# Altium PCB DT10966_MOTOR_CONTROLLER.PcbDoc (part 3 of 8)
Units mm, origin at the board's own origin, x right, y up, seen from the top; angles counter-clockwise.
Board outline 300 x 19 mm, 10 copper layers (Top Layer, Layer 2 GND, Layer 3 SIG, Layer 4 GND, Layer 5 PWR, Layer 6 PWR, Layer 7 GND, Layer 8 SIG, Layer 9 GND, Bottom Layer), stack 2.418 mm thick; 745 components, 446 nets, 2132 pads, 1222 vias.
Unrouted connection lines stored in the file: 3.
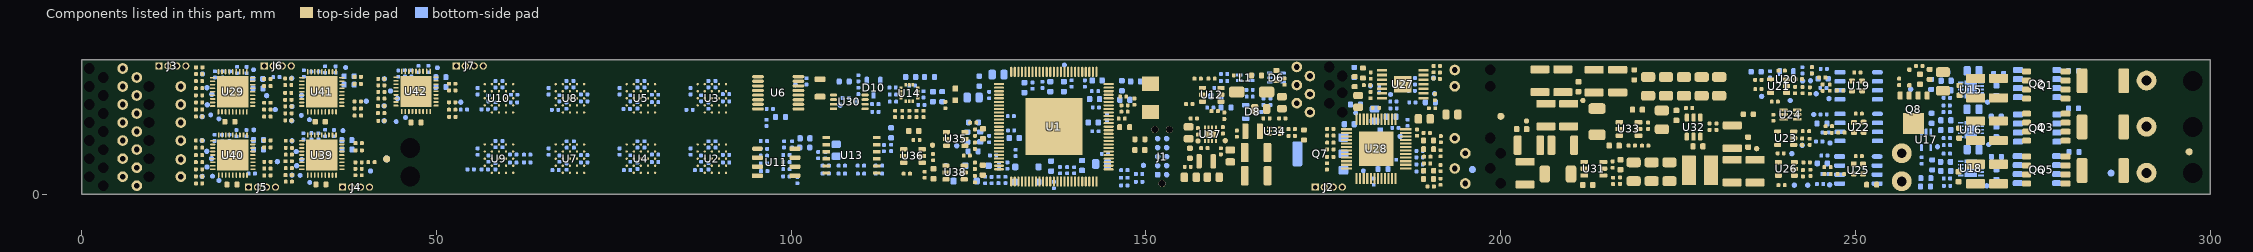
[diagram p10: the components of this part, seen from the top]

## Part data (continued)
L1: library part AWCU00201212900M02, "CMC 330MA 2LN 90OHM SMD AEC-Q200", Manufacturer="Pulse Electronics", MPN=AWCU00201212900M02
L2: library part CMP-00887-1, "FIXED IND 22UH 1.2A 500 MOHM SMD", Inductance=22µH, Manufacturer="Bourns Inc.", Op Temp max=150°C, Op Temp min=-40°C, Package=2-SMD, Ratings=AEC-Q200, Tolerance=20%, ComponentLink1Description=Datasheet, ComponentLink1URL=https://www.bourns.com/docs/Product-Datasheets/SRP4020TA.pdf, ComponentLink2Description=Mouser, ComponentLink2URL=https://eu.mouser.com/ProductDetail/Bourns/SRP4020TA-220M?qs=6oMev5NRZMH3jbGE7KrwKQ%3D%3D, ComponentLink3Description=Digikey, ComponentLink3URL=https://www.digikey.com/en/products/detail/bourns-inc/SRP4020TA-220M/6153694?s=N4IgTCBcDaIAQGUBKAFALABjBgKgQQFoxsBZEAXQF8g, DCR=0.5, Fsr=19MHz, Height max=2mm, I=1.2A, Isat=1.4A, Lead Spacing=0mm, Material - Core="Carbonyl Powder", Mounting Type=SM, MPN=SRP4020TA-220M, Shielding=Shielded, Size="4.45mm x 4.06mm", Type="Drum Core, Wirewound"
L3: library part IND_SRR4828A-180M, "FIXED IND 18UH 1.7A 160 MOHM SMD", Current - Saturation (Isat)=0.8A, Current Rating (Amps)=1.7A, DC Resistance (DCR)=160mOhm, Frequency - Self Resonant=22MHz, Inductance="18 µH", Inductance Frequency - Test="100 kHz", Manufacturer="Bourns Inc.", Q @ Freq=-, Ratings=AEC-Q200, Tolerance=±20%, ComponentLink1Description=DigiKey, ComponentLink1URL=https://www.digikey.com/en/products/detail/bourns-inc/SRR4828A-180M/7556024, ComponentLink2Description=Datasheet, ComponentLink2URL=https://www.bourns.com/docs/Product-Datasheets/SRR4828A.pdf, ComponentLink3Description=Mouser, ComponentLink3URL=https://eu.mouser.com/ProductDetail/Bourns/SRR4828A-180M?qs=EU6FO9ffTwc4nWVXADcZcw%3D%3D, Material - Core=Ferrite, Mounting Type=SM, MPN=SRR4828A-180M, Shielding=Shielded, Type="Drum Core, Wirewound"
L4: library part CMP-00885-1, "FIXED IND 8.2UH 2A 180 MOHM SMD", Inductance=8.2µH, Manufacturer="Bourns Inc.", Op Temp max=150°C, Op Temp min=-40°C, Package=2-SMD, Ratings=AEC-Q200, Tolerance=20%, ComponentLink1Description=Datasheet, ComponentLink1URL=https://www.bourns.com/docs/Product-Datasheets/SRP4020TA.pdf, ComponentLink2Description=Mouser, ComponentLink2URL=https://eu.mouser.com/ProductDetail/Bourns/SRP4020TA-8R2M?qs=Ph8%2FHnX6CQwwXiBs8JjSfQ%3D%3D, ComponentLink3Description=Digikey, ComponentLink3URL=https://www.digikey.com/en/products/detail/bourns-inc/SRP4020TA-8R2M/4901009?s=N4IgTCBcDaIMoCUAKAWADGNAVAggWgA4EwBZEAXQF8g, DCR=0.18, Fsr=21MHz, Height max=2mm, I=2A, Isat=2.5A, Lead Spacing=0mm, Material - Core="Carbonyl Powder", Mounting Type=SM, MPN=SRP4020TA-8R2M, Shielding=Shielded, Size="4.45mm x 4.06mm", Type="Drum Core, Wirewound"
L5: library part IND_DFE2HCAH1R5MJ0L, "FIXED IND 1.5UH 2.3A 74 MOHM SMD", Current - Saturation (Isat)=2.9A, Current Rating (Amps)="2.3 A", DC Resistance (DCR)="74mOhm Max", Frequency - Self Resonant=-, Inductance="1.5 µH", Inductance Frequency - Test="1 MHz", Manufacturer="Murata Electronics", Operating Temperature (MAX)=+150°C, Operating Temperature (MIN)=-40°C, Ratings=AEC-Q200, Tolerance=±20%, ComponentLink1Description=DigiKey, ComponentLink1URL=https://www.digikey.com/en/products/detail/murata-electronics/dfe2hcah1r5mj0l/10135181, ComponentLink2Description=Datasheet, ComponentLink2URL=https://search.murata.co.jp/Ceramy/image/img/P02/JETE243A-9105.pdf, ComponentLink3Description=Mouser, ComponentLink3URL=https://eu.mouser.com/ProductDetail/Murata-Electronics/DFE2HCAH1R5MJ0L?qs=17u8i%2FzlE8%2F0ipe6qBF76g%3D%3D, Material - Core=Metal, Mounting Type=SM, MPN=DFE2HCAH1R5MJ0L, Q @ Freq=-, Shielding=Shielded, Type="Drum Core, Wirewound"
L6: library part CMP-001-2041-1, "FIXED IND 1UH 3A 50 MOHM SMD", Inductance=1µH, Manufacturer="Murata Electronics", Op Temp max=150°C, Op Temp min=-40°C, Package="1008 (2520 Metric)", Ratings=AEC-Q200, Tolerance=20%, ComponentLink1Description=Datasheet, ComponentLink1URL=https://www.murata.com/en-us/products/productdetail?partno=DFE2HCAH1R0MJ0%23, ComponentLink2Description=Mouser, ComponentLink2URL=https://eu.mouser.com/ProductDetail/Murata-Electronics/DFE2HCAH1R0MJ0L?qs=17u8i%2FzlE8%2FsfvqDr48AMQ%3D%3D, ComponentLink3Description=Digikey, ComponentLink3URL=https://www.digikey.com/en/products/detail/murata-electronics/DFE2HCAH1R0MJ0L/10135180, DCR=50m, Fsr=79MHz, Height max=1.2mm, I=3A, Isat=3.4A, Lead Spacing=0mm, Material - Core=Metal, Mounting Type=SM, MPN=DFE2HCAH1R0MJ0L, Shielding=Shielded, Size="2.50mm x 2.00mm", Type="Drum Core, Wirewound"
Q1 Q2 Q3 Q4 Q5 Q6: "PB-F POWER MOSFET TRANSISTOR DSO", Manufacturer="Toshiba Semiconductor and Storage", MPN=TPW3R70APL,L1Q
Q7: "MOSFET N-CH 240V 350MA SOT223-4", Current - Continuous Drain (Id) @ 25°C="350mA (Ta)", Drain to Source Voltage (Vdss)="240 V", Drive Voltage (Max Rds On, Min Rds On)="0V, 10V", Input Capacitance (Ciss) (Max) @ Vds="108 pF @ 25 V", Manufacturer="Infineon Technologies", Operating Temperature (MAX)="+150°C (TJ)", Operating Temperature (MIN)="-55°C (TJ)", Package / Case="TO-261-4, TO-261AA", Power Dissipation (Max)="1.8W (Ta)", ComponentLink1Description=Datasheet, ComponentLink1URL=https://www.infineon.com/assets/row/public/documents/24/49/infineon-bsp129-ds-en.pdf?fileId=db3a30433c1a8752013c1fc296d2395, ComponentLink2Description=DigiKey, ComponentLink2URL=https://www.digikey.com/en/products/detail/infineon-technologies/BSP129H6327XTSA1/5410101?s=N4IgTCBcDaIEIGUAKBGMBOAEgNgMxgHYANAFQQEEUQBdAXyA, ComponentLink3Description=Mouser, ComponentLink3URL=https://eu.mouser.com/ProductDetail/Infineon-Technologies/BSP129H6327XTSA1?qs=LqwxS8kK3AtD0Dk5QHkDTA%3D%3D, Gate Charge (Qg) (Max) @ Vgs="5.7 nC @ 5 V", Mounting Type=SM, MPN=BSP129H6327XTSA1, Qualification=AEC-Q101, Rds On (Max) @ Id, Vgs="6Ohm @ 350mA, 10V", Vgs (MAX)=±20V, Vgs(th) (Max) @ Id="1V @ 108µA"
Q8: library part Q_SQJ185ELP-T1_GE3, "MOSFETs P-CHANNEL 80-V (D-S) 175C MOSFET", Current - Continuous Drain (Id) @ 25°C="62 A", Drain to Source Voltage (Vdss)="80 V", Drive Voltage (Max Rds On, Min Rds On)="-4.5V, -10V", Input Capacitance (Ciss) (Max) @ Vds="3510 pF @ -25 V", Manufacturer="Vishay Siliconix", Package / Case="PowerPAK® SO-8L", Power Dissipation (Max)="145 W", Ratings=AEC-Q101, Rds On - Drain-Source Resistance="19.5 mOhms", ComponentLink1Description=Datasheet, ComponentLink1URL=https://www.vishay.com/docs/62115/sqj185elp.pdf, ComponentLink2Description=DigiKey, ComponentLink3Description=Mouser, ComponentLink3URL=https://eu.mouser.com/ProductDetail/Vishay-Siliconix/SQJ185ELP-T1_GE3?qs=ZcfC38r4Posh2dea%252BP4W4A%3D%3D, FET Type=P-Channel, MPN=SQJ185ELP-T1_GE3, Vgs (MAX)=±20V
R1 R3 R18 R19 R20 R21 R22 R23 R34 R35 R37 R38 R39 R40 R50 R51 R52 R53 R54 R55 R64 R65 R66 R67 R68 R69 R84 R85 R86 R87 R92 R93 R94 R99 R100 R101 R102 R107 R108 R109 R110 R114 R115 R117 R119 R120 R122 R124 R125 R127 R146 R152 R159 R171 R172 R173 R174 R189 R191 R193 R194 R199 R200 R202 R203 R208 R216 R231 R233 R235 R236 R241 R246 R248 R250 R251 R256 R258 R260 R261 R266 R268 R270 R271 R275 R277 R292 R293 R294: library part CMP-001-0482-4, "RES 22 OHM 1% 1/16W 0402", Manufacturer=YAGEO, Op Temp max=155°C, Op Temp min=-55°C, Package="0402 (1005 Metric)", Power=63mW, Ratings=-, Resistance=22, Temperature Coefficient=±100ppm, Tolerance=1%, ComponentLink1Description=Datasheet, ComponentLink1URL=https://www.yageo.com/upload/media/product/productsearch/datasheet/rchip/PYu-RC_Group_51_RoHS_L_12.pdf, ComponentLink2Description=Mouser, ComponentLink2URL=https://eu.mouser.com/ProductDetail/YAGEO/RC0402FR-0722RL?qs=V1yeUXFNrkkRg6zf08ADKQ%3D%3D, ComponentLink3Description=Digikey, ComponentLink3URL=https://www.digikey.com/en/products/detail/yageo/RC0402FR-0722RL/726562, Composition="Thick Film", Height max=400µm, Mounting Type=SM, MPN=RC0402FR-0722RL, Size="1.00mm x 0.50mm"
R2: library part CMP-00539-4, "RES 1M OHM 1% 1/16W 0402", Manufacturer=YAGEO, Op Temp max=155°C, Op Temp min=-55°C, Package="0402 (1005 Metric)", Power=63mW, Ratings=-, Resistance=1M, Temperature Coefficient=±100ppm, Tolerance=1%, ComponentLink1Description=Datasheet, ComponentLink1URL=https://www.yageo.com/upload/media/product/productsearch/datasheet/rchip/PYu-RC_Group_51_RoHS_L_12.pdf, ComponentLink2Description=Mouser, ComponentLink2URL=https://eu.mouser.com/ProductDetail/YAGEO/RC0402FR-071ML?qs=V1yeUXFNrknfoI4987wfBQ%3D%3D, ComponentLink3Description=Digikey, ComponentLink3URL=https://www.digikey.com/en/products/detail/yageo/RC0402FR-071ML/726515, Composition="Thick Film", Height max=400µm, Mounting Type=SM, MPN=RC0402FR-071ML, Size="1.00mm x 0.50mm"
R4 R166 R169 R170 R176 R181 R183 R186 R195 R237 R252 R262 R272: library part CMP-001-0920-3, "DNP res 0603", MPN=DNP, Package="0603 (1608 Metric)", Mounting Type=SM
R5 R71 R72 R73 R74 R78 R89 R145 R151 R158 R180 R182 R190 R192 R232 R234 R247 R249 R257 R259 R267 R269: library part CMP-00010-6, "RES 10K OHM 1% 1/16W 0402", Manufacturer=YAGEO, Op Temp max=155°C, Op Temp min=-55°C, Package="0402 (1005 Metric)", Power=63mW, Ratings=-, Resistance=10k, Temperature Coefficient=±100ppm, Tolerance=1%, ComponentLink1Description=Datasheet, ComponentLink1URL=https://www.yageo.com/upload/media/product/productsearch/datasheet/rchip/PYu-RC_Group_51_RoHS_L_12.pdf, ComponentLink2Description=Mouser, ComponentLink2URL=https://www2.mouser.com/ProductDetail/YAGEO/RC0402FR-0710KL?qs=%2Fha2pyFaduhjtLcYvKXQ8NAGbRXkQ%2Fwl6RsvWHeV66MSeqLhkcF3rg%3D%3D, ComponentLink3Description=Digikey, ComponentLink3URL=https://www.digikey.com/en/products/detail/yageo/RC0402FR-0710KL/726523, Composition="Thick Film", Height max=400µm, Mounting Type=SM, MPN=RC0402FR-0710KL, Size="1.00mm x 0.50mm"
R6 R7 R8 R9 R207 R210: library part CMP-001-0208-12, "RES SMD 0 OHM JUMPER 1/16W 0402", Manufacturer=YAGEO, Op Temp max=155°C, Op Temp min=-55°C, Package="0402 (1005 Metric)", Power=63mW, Ratings=-, Resistance=0, Temperature Coefficient=±100ppm, Tolerance=0%, ComponentLink1Description=Datasheet, ComponentLink1URL=https://www.yageo.com/upload/media/product/productsearch/datasheet/rchip/PYu-RC_Group_51_RoHS_L_12.pdf, ComponentLink2Description=Mouser, ComponentLink2URL=https://eu.mouser.com/ProductDetail/YAGEO/RC0402FR-070RL?qs=%2Fha2pyFaduhjtLcYvKXQ8C3M6h5LO%252B8bxxSVLF2BfkIYKpoExpS33A%3D%3D, ComponentLink3Description=Digikey, ComponentLink3URL=https://www.digikey.com/en/products/detail/yageo/RC0402FR-070RL/2827570, Composition="Thick Film", Height max=400µm, Mounting Type=SM, MPN=RC0402FR-070RL, Size="1.00mm x 0.50mm"
R10 R11 R12 R13 R14 R15 R16 R17 R24 R25 R26 R27 R28 R29 R30 R31 R32 R33 R36 R41 R42 R43 R44 R45 R46 R47 R48 R49 R56 R57 R58 R59 R60 R61 R62 R63 R79 R80 R81 R82 R83 R88 R90 R91 R96 R97 R98 R103 R105 R106 R111 R112 R168 R188 R198 R230 R245 R255 R265: library part CMP-001-0277-7, "RES 47.5K OHM 1% 1/16W 0402", Manufacturer=YAGEO, Op Temp max=155°C, Op Temp min=-55°C, Package="0402 (1005 Metric)", Power=63mW, Ratings=-, Resistance=47.5k, Temperature Coefficient=±100ppm, Tolerance=1%, ComponentLink1Description=Datasheet, ComponentLink1URL=https://www.yageo.com/upload/media/product/productsearch/datasheet/rchip/PYu-RC_Group_51_RoHS_L_12.pdf, ComponentLink2Description=Mouser, ComponentLink2URL=https://eu.mouser.com/ProductDetail/YAGEO/RC0402FR-0747K5L?qs=V1yeUXFNrklfu86Rfgihxg%3D%3D, ComponentLink3Description=Digikey, ComponentLink3URL=https://www.digikey.com/en/products/detail/yageo/RC0402FR-0747K5L/726617, Composition="Thick Film", Height max=400µm, Mounting Type=SM, MPN=RC0402FR-0747K5L, Size="1.00mm x 0.50mm"
R70 R75 R76 R77 R116 R118 R121 R123 R126 R128 R134 R135 R136 R143 R144 R147 R154 R155 R157 R160 R163 R175 R187 R201 R229 R239 R240 R242 R244 R254 R264 R286 R287 R288 R290: library part CMP-001-0927-2, "RES 0 OHM JUMPER 1/10W 0603", Manufacturer=YAGEO, Op Temp max=155°C, Op Temp min=-55°C, Package="0603 (1608 Metric)", Power=100mW, Ratings=-, Resistance=0, Tolerance=0%, ComponentLink1Description=Datasheet, ComponentLink1URL=https://www.yageo.com/upload/media/product/productsearch/datasheet/rchip/PYu-RC_Group_51_RoHS_L_12.pdf, ComponentLink2Description=Mouser, ComponentLink2URL=https://eu.mouser.com/ProductDetail/YAGEO/RC0603FR-070RL?qs=0yPvnVz5%2FmpDQv43TwvCfw%3D%3D, ComponentLink3Description=Digikey, ComponentLink3URL=https://www.digikey.com/en/products/detail/yageo/RC0603FR-070RL/1304008, Composition="Thick Film", Height max=550µm, Mounting Type=SM, MPN=RC0603FR-070RL, Size="1.60mm x 0.80mm", Temperature Coefficient=-
R95: library part CMP-00125-8, "RES 5.1 OHM 1% 1/16W 0402", Manufacturer=YAGEO, Op Temp max=155°C, Op Temp min=-55°C, Package="0402 (1005 Metric)", Power=63mW, Ratings=-, Resistance=5.1, Temperature Coefficient=±200ppm, Tolerance=1%, ComponentLink1Description=Datasheet, ComponentLink1URL=https://www.yageo.com/upload/media/product/productsearch/datasheet/rchip/PYu-RC_Group_51_RoHS_L_12.pdf, ComponentLink2Description=Mouser, ComponentLink2URL=https://eu.mouser.com/ProductDetail/YAGEO/RC0402FR-075R1L?qs=%2Fha2pyFaduhjtLcYvKXQ8B9EFTm6YmMloHxcmTFokS12j5yrT26S1A%3D%3D, ComponentLink3Description=Digikey, ComponentLink3URL=https://www.digikey.com/en/products/detail/yageo/RC0402FR-075R1L/5917722, Composition="Thick Film", Height max=400µm, Mounting Type=SM, MPN=RC0402FR-075R1L, Size="1.00mm x 0.50mm"
R129 R139 R149: library part RC_CRA2512-FZ-R020ELF, "RES 0.02 OHM 1% 3W 2512", Manufacturer="Bourns Inc.", Op Temp max=170°C, Op Temp min=-55°C, Package="2512 (6332 Metric)", Power=3W, Ratings="Automotive AEC-Q200", Resistance=20m, Temperature Coefficient=±50ppm/°C, Tolerance=±1%, Component Type="Chip Resistor", ComponentLink1Description=Datasheet, ComponentLink1URL=https://www.bourns.com/docs/product-datasheets/cra.pdf, ComponentLink2Description=Mouser, ComponentLink2URL=https://eu.mouser.com/ProductDetail/Bourns/CRA2512-FZ-R020ELF?qs=WqWCsLCZBkqBWIN8p659hA%3D%3D, ComponentLink3Description=Digikey, ComponentLink3URL=https://www.digikey.com/en/products/detail/bourns-inc/CRA2512-FZ-R020ELF/1775030, Composition="Metal Element", Height max=0.90mm, Mounting Type=SM, MPN=CRA2512-FZ-R020ELF, Size="6.45mm x 3.35mm"
R130 R131 R140 R150 R206 R209 R212 R213 R219 R223 R227: library part CMP-00121-6, "RES 100K OHM 1% 1/16W 0402", Manufacturer=YAGEO, Op Temp max=155°C, Op Temp min=-55°C, Package="0402 (1005 Metric)", Power=63mW, Ratings=-, Resistance=100k, Temperature Coefficient=±100ppm, Tolerance=1%, ComponentLink1Description=Datasheet, ComponentLink1URL=https://www.yageo.com/upload/media/product/productsearch/datasheet/rchip/PYu-RC_Group_51_RoHS_L_12.pdf, ComponentLink2Description=Mouser, ComponentLink2URL=https://eu.mouser.com/ProductDetail/YAGEO/RC0402FR-07100KL?qs=%2Fha2pyFaduhjtLcYvKXQ8IUndG0u%252BuCx1gxMxvN%252Btd7iB7mgHWsSbw%3D%3D, ComponentLink3Description=Digikey, ComponentLink3URL=https://www.digikey.com/en/products/detail/yageo/RC0402FR-07100KL/726526, Composition="Thick Film", Height max=400µm, Mounting Type=SM, MPN=RC0402FR-07100KL, Size="1.00mm x 0.50mm"
R132 R133 R142 R153: library part CMP-00686-2, "RES 4.22K OHM 1% 1/16W 0402", Manufacturer=YAGEO, Op Temp max=155°C, Op Temp min=-55°C, Package="0402 (1005 Metric)", Power=63mW, Ratings=-, Resistance=4.22k, Temperature Coefficient=±100ppm, Tolerance=1%, ComponentLink1Description=Datasheet, ComponentLink1URL=https://www.yageo.com/upload/media/product/productsearch/datasheet/rchip/PYu-RC_Group_51_RoHS_L_12.pdf, ComponentLink2Description=Mouser, ComponentLink2URL=https://eu.mouser.com/ProductDetail/YAGEO/RC0402FR-074K22L?qs=UOUeRUa%252B8WlIkeLfnYGqDQ%3D%3D, ComponentLink3Description=Digikey, ComponentLink3URL=https://www.digikey.com/en/products/detail/yageo/RC0402FR-074K22L/5281032?s=N4IgTCBcDaIEoGEAMAWJYBicC0SDsKA0mGADIgC6AvkA, Composition="Thick Film", Height max=400µm, Mounting Type=SM, MPN=RC0402FR-074K22L, Size="1.00mm x 0.50mm"
R137: library part CMP-001-1595-1, "RES 54.9K OHM 1% 1/16W 0402", Manufacturer=YAGEO, Op Temp max=155°C, Op Temp min=-55°C, Package="0402 (1005 Metric)", Power=63mW, Ratings=-, Resistance=54.9k, Temperature Coefficient=±100ppm, Tolerance=1%, ComponentLink1Description=Datasheet, ComponentLink1URL=https://www.yageo.com/upload/media/product/products/datasheet/rchip/PYu-RC_Group_51_RoHS_L_12.pdf, ComponentLink2Description=Mouser, ComponentLink2URL=https://eu.mouser.com/ProductDetail/YAGEO/RC0402FR-0754K9L?qs=4PGqJHn8QVJggq6NOjvQiQ%3D%3D, ComponentLink3Description=Digikey, ComponentLink3URL=https://www.digikey.com/en/products/detail/yageo/RC0402FR-0754K9L/5281045, Composition="Thick Film", Height max=400µm, Mounting Type=SM, MPN=RC0402FR-0754K9L, Size="1.00mm x 0.50mm"
R138: library part CMP-00590-3, "RES 274K OHM 1% 1/16W 0402", Manufacturer=YAGEO, Op Temp max=155°C, Op Temp min=-55°C, Package="0402 (1005 Metric)", Power=63mW, Ratings=-, Resistance=274k, Temperature Coefficient=±100ppm, Tolerance=1%, ComponentLink1Description=Datasheet, ComponentLink1URL=https://www.yageo.com/upload/media/product/productsearch/datasheet/rchip/PYu-RC_Group_51_RoHS_L_12.pdf, ComponentLink2Description=Mouser, ComponentLink2URL=https://eu.mouser.com/ProductDetail/YAGEO/RC0402FR-07274KL?qs=UOUeRUa%252B8WkXvujgT9w63w%3D%3D, ComponentLink3Description=Digikey, ComponentLink3URL=https://www.digikey.com/en/products/detail/yageo/RC0402FR-07274KL/5280943?s=N4IgTCBcDaIEoGEAMAWJYBicC0SDsYeKA0gDIgC6AvkA, Composition="Thick Film", Height max=400µm, Mounting Type=SM, MPN=RC0402FR-07274KL, Size="1.00mm x 0.50mm"
R141 R148 R156: library part CMP-00670-2, "RES 332K OHM 1% 1/16W 0402", Manufacturer=YAGEO, Op Temp max=155°C, Op Temp min=-55°C, Package="0402 (1005 Metric)", Power=63mW, Ratings=-, Resistance=332k, Temperature Coefficient=±100ppm, Tolerance=1%, ComponentLink1Description=Datasheet, ComponentLink1URL=https://www.yageo.com/upload/media/product/productsearch/datasheet/rchip/PYu-RC_Group_51_RoHS_L_12.pdf, ComponentLink2Description=Mouser, ComponentLink2URL=https://eu.mouser.com/ProductDetail/YAGEO/RC0402FR-07332KL?qs=5YWhraou11DzMN0bHRRHtQ%3D%3D, ComponentLink3Description=Digikey, ComponentLink3URL=https://www.digikey.com/en/products/detail/yageo/RC0402FR-07332KL/726595?s=N4IgTCBcDaIEoGEAMAWJYBicC0SDsAzAWANIAyIAugL5A, Composition="Thick Film", Height max=400µm, Mounting Type=SM, MPN=RC0402FR-07332KL, Size="1.00mm x 0.50mm"
R161 R167: library part CMP-001-0533-6, "RES 510K OHM 1% 1/16W 0402", Manufacturer=YAGEO, Op Temp max=155°C, Op Temp min=-55°C, Package="0402 (1005 Metric)", Power=63mW, Ratings=-, Resistance=510k, Temperature Coefficient=±100ppm, Tolerance=1%, ComponentLink1Description=Datasheet, ComponentLink1URL=https://www.yageo.com/upload/media/product/productsearch/datasheet/rchip/PYu-RC_Group_51_RoHS_L_12.pdf, ComponentLink2Description=Mouser, ComponentLink2URL=https://eu.mouser.com/ProductDetail/YAGEO/RC0402FR-07510KL?qs=V1yeUXFNrkkq0IeA5n8CcA%3D%3D, ComponentLink3Description=Digikey, ComponentLink3URL=https://www.digikey.com/en/products/detail/yageo/RC0402FR-07510KL/726631, Composition="Thick Film", Height max=400µm, Mounting Type=SM, MPN=RC0402FR-07510KL, Size="1.00mm x 0.50mm"
R162 R164: library part CMP-00475-6, "RES 31.6K OHM 1% 1/16W 0402", Manufacturer=YAGEO, Op Temp max=155°C, Op Temp min=-55°C, Package="0402 (1005 Metric)", Power=63mW, Ratings=-, Resistance=31.6k, Temperature Coefficient=±100ppm, Tolerance=1%, ComponentLink1Description=Datasheet, ComponentLink1URL=https://www.yageo.com/upload/media/product/productsearch/datasheet/rchip/PYu-RC_Group_51_RoHS_L_12.pdf, ComponentLink2Description=Mouser, ComponentLink2URL=https://eu.mouser.com/ProductDetail/YAGEO/RC0402FR-0731K6L?qs=tQYgeJ5sXdm2wsAqEjplmg%3D%3D, ComponentLink3Description=Digikey, ComponentLink3URL=https://www.digikey.com/en/products/detail/yageo/RC0402FR-0731K6L/5280975, Composition="Thick Film", Height max=400µm, Mounting Type=SM, MPN=RC0402FR-0731K6L, Size="1.00mm x 0.50mm"
R165 R196 R205 R238 R253 R263 R273 R291: library part CMP-001-0497-6, "RES 110 OHM 1% 1/16W 0402", Manufacturer=YAGEO, Op Temp max=155°C, Op Temp min=-55°C, Package="0402 (1005 Metric)", Power=63mW, Ratings=-, Resistance=110, Temperature Coefficient=±100ppm, Tolerance=1%, ComponentLink1Description=Datasheet, ComponentLink1URL=https://www.yageo.com/upload/media/product/productsearch/datasheet/rchip/PYu-RC_Group_51_RoHS_L_12.pdf, ComponentLink2Description=Mouser, ComponentLink2URL=https://eu.mouser.com/ProductDetail/YAGEO/RC0402FR-07110RL?qs=QWYorlrD8IXj7iGvwWbRbA%3D%3D, ComponentLink3Description=Digikey, ComponentLink3URL=https://www.digikey.com/en/products/detail/yageo/RC0402FR-07110RL/2827583, Composition="Thick Film", Height max=400µm, Mounting Type=SM, MPN=RC0402FR-07110RL, Size="1.00mm x 0.50mm"
R177 R179 R184 R185: library part CMP-001-0515-6, "RES 43K OHM 1% 1/16W 0402", Manufacturer=YAGEO, Op Temp max=155°C, Op Temp min=-55°C, Package="0402 (1005 Metric)", Power=63mW, Ratings=-, Resistance=43k, Temperature Coefficient=±100ppm, Tolerance=1%, ComponentLink1Description=Datasheet, ComponentLink1URL=https://www.yageo.com/upload/media/product/productsearch/datasheet/rchip/PYu-RC_Group_51_RoHS_L_12.pdf, ComponentLink2Description=Mouser, ComponentLink2URL=https://eu.mouser.com/ProductDetail/YAGEO/RC0402FR-0743KL?qs=Is6ZsIPfHkZH7Q2ies02Tw%3D%3D, ComponentLink3Description=Digikey, ComponentLink3URL=https://www.digikey.com/en/products/detail/yageo/RC0402FR-0743KL/726609, Composition="Thick Film", Height max=400µm, Mounting Type=SM, MPN=RC0402FR-0743KL, Size="1.00mm x 0.50mm"
R204: library part CMP-00547-4, "RES 49.9K OHM 1% 1/16W 0402", Manufacturer=YAGEO, Op Temp max=155°C, Op Temp min=-55°C, Package="0402 (1005 Metric)", Power=63mW, Ratings=-, Resistance=49.9k, Temperature Coefficient=±100ppm, Tolerance=1%, ComponentLink1Description=Datasheet, ComponentLink1URL=https://www.yageo.com/upload/media/product/productsearch/datasheet/rchip/PYu-RC_Group_51_RoHS_L_12.pdf, ComponentLink2Description=Mouser, ComponentLink2URL=https://eu.mouser.com/ProductDetail/YAGEO/RC0402FR-0749K9L?qs=QT1cPpUoD8GsWnpgOWR2jA%3D%3D, ComponentLink3Description=Digikey, ComponentLink3URL=https://www.digikey.com/en/products/detail/yageo/RC0402FR-0749K9L/726620, Composition="Thick Film", Height max=400µm, Mounting Type=SM, MPN=RC0402FR-0749K9L, Size="1.00mm x 0.50mm"
R214: library part RC_0402_ERJ-2RKF5621X, "RES SMD 5.62K OHM 1% 1/10W 0402", Manufacturer="Panasonic Electronic Components", Op Temp max=155°C, Op Temp min=-55°C, Package="0402 (1005 Metric)", Power="0.1W, 1/10W", Ratings="Automotive AEC-Q200", Resistance=5K62, Temperature Coefficient=±100ppm/°C, Tolerance=1%, Component Type="Chip Resistor", ComponentLink1Description=Datasheet, ComponentLink1URL=https://industrial.panasonic.com/cdbs/www-data/pdf/RDA0000/AOA0000C304.pdf, ComponentLink2Description=Mouser, ComponentLink2URL=https://eu.mouser.com/ProductDetail/Panasonic/ERJ-2RKF5621X?qs=YMBIwoNQYdVW%2FAKb0KIR9A%3D%3D, ComponentLink3Description=Digikey, ComponentLink3URL=https://www.digikey.at/en/products/detail/panasonic-electronic-components/ERJ-2RKF5621X/192390?s=N4IgTCBcDaIKICUBSBaMCDSAxArANjAEYANEAXQF8g, Composition="Thick Film", Height max=0.40mm, Mounting Type=SM, MPN=ERJ-2RKF5621X, Size="1.00mm x 0.50mm"
R215: library part RC_0402_ERJ-2RKF7151X, "RES SMD 7.15K OHM 1% 1/10W 0402", Manufacturer="Panasonic Electronic Components", Op Temp max=155°C, Op Temp min=-55°C, Package="0402 (1005 Metric)", Power="0.1W, 1/10W", Ratings="Automotive AEC-Q200", Resistance=7K15, Temperature Coefficient=±100ppm/°C, Tolerance=1%, Component Type="Chip Resistor", ComponentLink1Description=Datasheet, ComponentLink1URL=https://industrial.panasonic.com/cdbs/www-data/pdf/RDA0000/AOA0000C304.pdf, ComponentLink2Description=Mouser, ComponentLink2URL=https://eu.mouser.com/ProductDetail/Panasonic/ERJ-2RKF7151X?qs=iBwFsHVUAOeT%2FIodbHv05A%3D%3D, ComponentLink3Description=Digikey, ComponentLink3URL=https://www.digikey.at/en/products/detail/panasonic-electronic-components/ERJ-2RKF7151X/192455?s=N4IgTCBcDaIKICUBSBaMCDSAxA7ARgFY8ANEAXQF8g, Composition="Thick Film", Height max=0.40mm, Mounting Type=SM, MPN=ERJ-2RKF7151X, Size="1.00mm x 0.50mm"
R218: library part CMP-001-0382-5, "RES 135K OHM 1% 1/16W 0402", Manufacturer="KOA Speer Electronics, Inc.", Op Temp max=155°C, Op Temp min=-55°C, Package="0402 (1005 Metric)", Power=63mW, Ratings="Automotive AEC-Q200, Moisture Resistant", Resistance=135k, Temperature Coefficient=±100ppm, Tolerance=1%, ComponentLink1Description=Datasheet, ComponentLink1URL=https://www.yageo.com/upload/media/product/productsearch/datasheet/rchip/PYu-RC_Group_51_RoHS_L_12.pdf, ComponentLink2Description=Mouser, ComponentLink2URL=https://www.koaspeer.com/pdfs/RN73H.pdf, ComponentLink3Description=Digikey, ComponentLink3URL=https://www.digikey.at/en/products/detail/koa-speer-electronics-inc/RN73H1ETTP1353F50/9914841, Composition="Thick Film", Height max=400µm, Mounting Type=SM, MPN=RN73H1ETTP1353F50, Size="1.00mm x 0.50mm"
R220: library part CMP-001-0510-4, "RES 30K OHM 1% 1/16W 0402", Manufacturer=YAGEO, Op Temp max=155°C, Op Temp min=-55°C, Package="0402 (1005 Metric)", Power=63mW, Ratings=-, Resistance=30k, Temperature Coefficient=±100ppm, Tolerance=1%, ComponentLink1Description=Datasheet, ComponentLink1URL=https://www.yageo.com/upload/media/product/productsearch/datasheet/rchip/PYu-RC_Group_51_RoHS_L_12.pdf, ComponentLink2Description=Mouser, ComponentLink2URL=https://eu.mouser.com/ProductDetail/YAGEO/RC0402FR-0730KL?qs=YUgVZYePFqD%252BaGg4iT%252Br5g%3D%3D, ComponentLink3Description=Digikey, ComponentLink3URL=https://www.digikey.com/en/products/detail/yageo/RC0402FR-0730KL/726586, Composition="Thick Film", Height max=400µm, Mounting Type=SM, MPN=RC0402FR-0730KL, Size="1.00mm x 0.50mm"
R221: library part CMP-00419-6, "RES 1.91K OHM 1% 1/16W 0402", Manufacturer=YAGEO, Op Temp max=155°C, Op Temp min=-55°C, Package="0402 (1005 Metric)", Power=63mW, Ratings=-, Resistance=1.91k, Temperature Coefficient=±100ppm, Tolerance=1%, ComponentLink1Description=Datasheet, ComponentLink1URL=https://www.yageo.com/upload/media/product/productsearch/datasheet/rchip/PYu-RC_Group_51_RoHS_L_12.pdf, ComponentLink2Description=Mouser, ComponentLink2URL=https://eu.mouser.com/ProductDetail/YAGEO/RC0402FR-071K91L?qs=%2Fha2pyFaduhjtLcYvKXQ8Exvf7RdQuNEJrJL9EjAZgPVltTSbbI12w%3D%3D, ComponentLink3Description=Digikey, ComponentLink3URL=https://www.digikey.com/en/products/detail/yageo/RC0402FR-071K91L/5280909, Composition="Thick Film", Height max=400µm, Mounting Type=SM, MPN=RC0402FR-071K91L, Size="1.00mm x 0.50mm"
R222: library part CMP-00630-3, "RES 178K OHM 1% 1/16W 0402", Manufacturer=YAGEO, Op Temp max=155°C, Op Temp min=-55°C, Package="0402 (1005 Metric)", Power=63mW, Ratings=-, Resistance=178k, Temperature Coefficient=±100ppm, Tolerance=1%, ComponentLink1Description=Datasheet, ComponentLink1URL=https://www.yageo.com/upload/media/product/productsearch/datasheet/rchip/PYu-RC_Group_51_RoHS_L_12.pdf, ComponentLink2Description=Mouser, ComponentLink2URL=https://eu.mouser.com/ProductDetail/YAGEO/RC0402FR-07178KL?qs=UOUeRUa%252B8WmEoK18p4ojZQ%3D%3D, ComponentLink3Description=Digikey, ComponentLink3URL=https://www.digikey.com/en/products/detail/yageo/RC0402FR-07178KL/5280870?s=N4IgTCBcDaIEoGEAMAWJYBicC0SDsAjHgBwDSAMiALoC%2BQA, Composition="Thick Film", Height max=400µm, Mounting Type=SM, MPN=RC0402FR-07178KL, Size="1.00mm x 0.50mm"
R224 R228: library part CMP-001-0492-6, "RES 56 OHM 1% 1/16W 0402", Manufacturer=YAGEO, Op Temp max=155°C, Op Temp min=-55°C, Package="0402 (1005 Metric)", Power=63mW, Ratings=-, Resistance=56, Temperature Coefficient=±100ppm, Tolerance=1%, ComponentLink1Description=Datasheet, ComponentLink1URL=https://www.yageo.com/upload/media/product/productsearch/datasheet/rchip/PYu-RC_Group_51_RoHS_L_12.pdf, ComponentLink2Description=Mouser, ComponentLink2URL=https://eu.mouser.com/ProductDetail/YAGEO/RC0402FR-0756RL?qs=V1yeUXFNrkmJal7VE1rFjw%3D%3D, ComponentLink3Description=Digikey, ComponentLink3URL=https://www.digikey.com/en/products/detail/yageo/RC0402FR-0756RL/726636, Composition="Thick Film", Height max=400mm, Mounting Type=SM, MPN=RC0402FR-0756RL, Size="1.00mm x 0.50mm"
R225: library part CMP-001-2043-2, "RES 39.2K OHM 1% 1/16W 0402", Manufacturer="Stackpole Electronics Inc", Op Temp max=155°C, Op Temp min=-55°C, Package="0402 (1005 Metric)", Power=63mW, Ratings=AEC-Q200, Resistance=39.2k, Temperature Coefficient=±100ppm, Tolerance=1%, ComponentLink1Description=Datasheet, ComponentLink1URL=https://www.seielect.com/catalog/sei-rmcf_rmcp.pdf, ComponentLink2Description=Mouser, ComponentLink2URL=https://eu.mouser.com/ProductDetail/SEI-Stackpole/RMCF0402FT39K2?qs=IPgv5n7u5QZ19xDSJPwVdQ%3D%3D, ComponentLink3Description=Digikey, ComponentLink3URL=https://www.digikey.com/en/products/detail/stackpole-electronics-inc/RMCF0402FT39K2/1761390, Composition="Thick Film", Height max=400µm, Mounting Type=SM, MPN=RMCF0402FT39K2, Size="1.00mm x 0.50mm"
R226: library part CMP-00721-2, "RES 64.9K OHM 1% 1/16W 0402", Manufacturer=YAGEO, Op Temp max=155°C, Op Temp min=-55°C, Package="0402 (1005 Metric)", Power=63mW, Ratings=-, Resistance=64.9k, Temperature Coefficient=±100ppm, Tolerance=1%, ComponentLink1Description=Datasheet, ComponentLink1URL=https://www.yageo.com/upload/media/product/productsearch/datasheet/rchip/PYu-RC_Group_51_RoHS_L_12.pdf, ComponentLink2Description=Mouser, ComponentLink2URL=https://eu.mouser.com/ProductDetail/YAGEO/RC0402FR-0764K9L?qs=Is6ZsIPfHkbVUkOpst8WdA%3D%3D, ComponentLink3Description=Digikey, ComponentLink3URL=https://www.digikey.com/en/products/detail/yageo/RC0402FR-0764K9L/726649?s=N4IgTCBcDaIEoGEAMAWJYBicC0SDsAbCgNICcAMiALoC%2BQA, Composition="Thick Film", Height max=400µm, Mounting Type=SM, MPN=RC0402FR-0764K9L, Size="1.00mm x 0.50mm"
TP1 TP2 TP23 TP28 TP36 TP37 TP49 TP57 TP58 TP60 TP68 TP69 TP70 TP78 TP79 TP80 TP88 TP89 TP90 TP91: library part TP_1.5
TP3 TP4 TP5 TP6 TP7 TP8 TP9 TP10 TP11 TP12 TP13 TP14 TP15 TP16 TP17 TP18 TP19 TP20 TP21 TP22 TP24 TP27 TP29 TP30 TP31 TP32 TP35 TP38 TP39 TP40 TP41 TP42 TP43 TP44 TP45 TP46 TP47 TP48 TP50 TP51 TP52 TP53 TP56 TP59 TP61 TP62 TP63 TP64 TP67 TP71 TP72 TP73 TP74 TP77 TP81 TP82 TP83 TP84 TP87 TP92 TP93 TP94 TP95 TP96: library part TP_0.75, "Test point 0.75mm"
U1: library part TMS320F28377SPZPQ, "IC MCU 32BIT 1MB FLASH 100HTQFP", Manufacturer="Texas Instruments", MPN=TMS320F28377SPZPQ
U2 U3 U4 U5 U7 U8 U9 U10: "IC FLASH 1GBIT SPI 24TPBGA", Manufacturer="Micron Technology Inc.", MPN=MT25QL01GBBB8E12-0AUT
U6: "IC DECODER/DEMUX 1X3:8 16-TSSOP", Manufacturer="Texas Instruments", MPN=SN74LVC138AMPWTEP
U11: "IC EEPROM 256KBIT SPI 5MHZ 8SOIC", Manufacturer="Microchip Technology", MPN=25LC256-H/SN
U12: "AUTOMOTIVE 0.8C SPI TEMPERATURE", Manufacturer="Texas Instruments", MPN=TMP127EDBVRQ1
U13: "ACCELEROMETER 6G SPI 12SMD", Manufacturer="Murata Electronics", MPN=SCA3100-D07-1
U14: "Accelerometer X, Y, Z Axis ±15g, 30g, 60g 50Hz ~ 8kHz 14-LGA (2.9x2.8)", Manufacturer="Analog Devices Inc.", MPN=ADXL382-2BCCZ-RL7
U15 U16 U18: "IC GATE DRVR HALF-BRIDGE 10DFN", Manufacturer="Allegro MicroSystems", MPN=A89500KEJSR
U17: library part IC_SN74LVC1G02DCKR, "IC GATE NOR 1CH 2-INP SC70-5", Current - Output High, Low="32mA, 32mA", Current - Quiescent (Max)="10 µA", Manufacturer="Texas Instruments", Operating Temperature (MAX)=+125°C, Operating Temperature (MIN)=-40°C, Package / Case="5-TSSOP, SC-70-5, SOT-353", Voltage - Supply="1.65V ~ 5.5V", ComponentLink1Description=Datasheet, ComponentLink1URL=https://www.ti.com/lit/ds/symlink/sn74lvc1g02.pdf?HQS=dis-dk-null-digikeymode-dsf-pf-null-wwe&ts=1752995079783&ref_url=https%253A%252F%252Fwww.ti.com%252Fgeneral%252Fdocs%252Fsuppproductinfo.tsp%253FdistId%253D10%2526gotoUrl%253Dhttps%253A%252F%252Fwww.ti.com%252Flit%252Fgpn%252Fsn74lvc1g02, ComponentLink2Description=DigiKey, ComponentLink2URL=https://www.digikey.gr/en/products/detail/texas-instruments/SN74LVC1G02DCKR/385715, ComponentLink3Description=Mouser, ComponentLink3URL=https://eu.mouser.com/ProductDetail/Texas-Instruments/SN74LVC1G02DCKR?qs=HE9hdJajmerjAA9y3nGmcA%3D%3D, Input Logic Level - High="1.7V ~ 2V", Input Logic Level - Low="0.7V ~ 0.8V", Logic Type="NOR Gate", Max Propagation Delay @ V, Max CL="4.5ns @ 5V, 50pF", Mounting Type=SM, MPN=SN74LVC1G02DCKR, Number of Circuits=1, Number of Inputs=2
U19 U22 U25: "IC CURRENT SENSE 1 CIRCUIT 8SOIC", Manufacturer="Texas Instruments", MPN=INA240A1EDRQ1